# EAGLE board bom_mixed_eol (EAGLE 9.6.2)

No outline drawn. Coordinates in mm, seen from the top.
Copper layers used: 

## Placement (x,y rotation side)
R1  1k  [P]  1,1 0 top

## Library data of the parts
R1 = x